# Altium PCB MainBoardPCB_PWR.PcbDoc (part 22 of 29)
Units mm, origin at the board's own origin, x right, y up, seen from the top; angles counter-clockwise.
Board outline 333.63 x 349.38 mm, 16 copper layers (L1, L2 (GND), L3 (Sign), L4 (GND), L5 (Sign), L6 (PWR/GND), L7(PWR/GND), L8 (PWR/GND), L9 (PWR/GND), L10 (PWR/GND), L11 (PWR/GND), L12 (Sign), L13 (GND), L14 (Sign), L15 (GND), L16), stack 2.503 mm thick; 2187 components, 1615 nets, 7987 pads, 1695 vias.
Unrouted connection lines stored in the file: 4757.
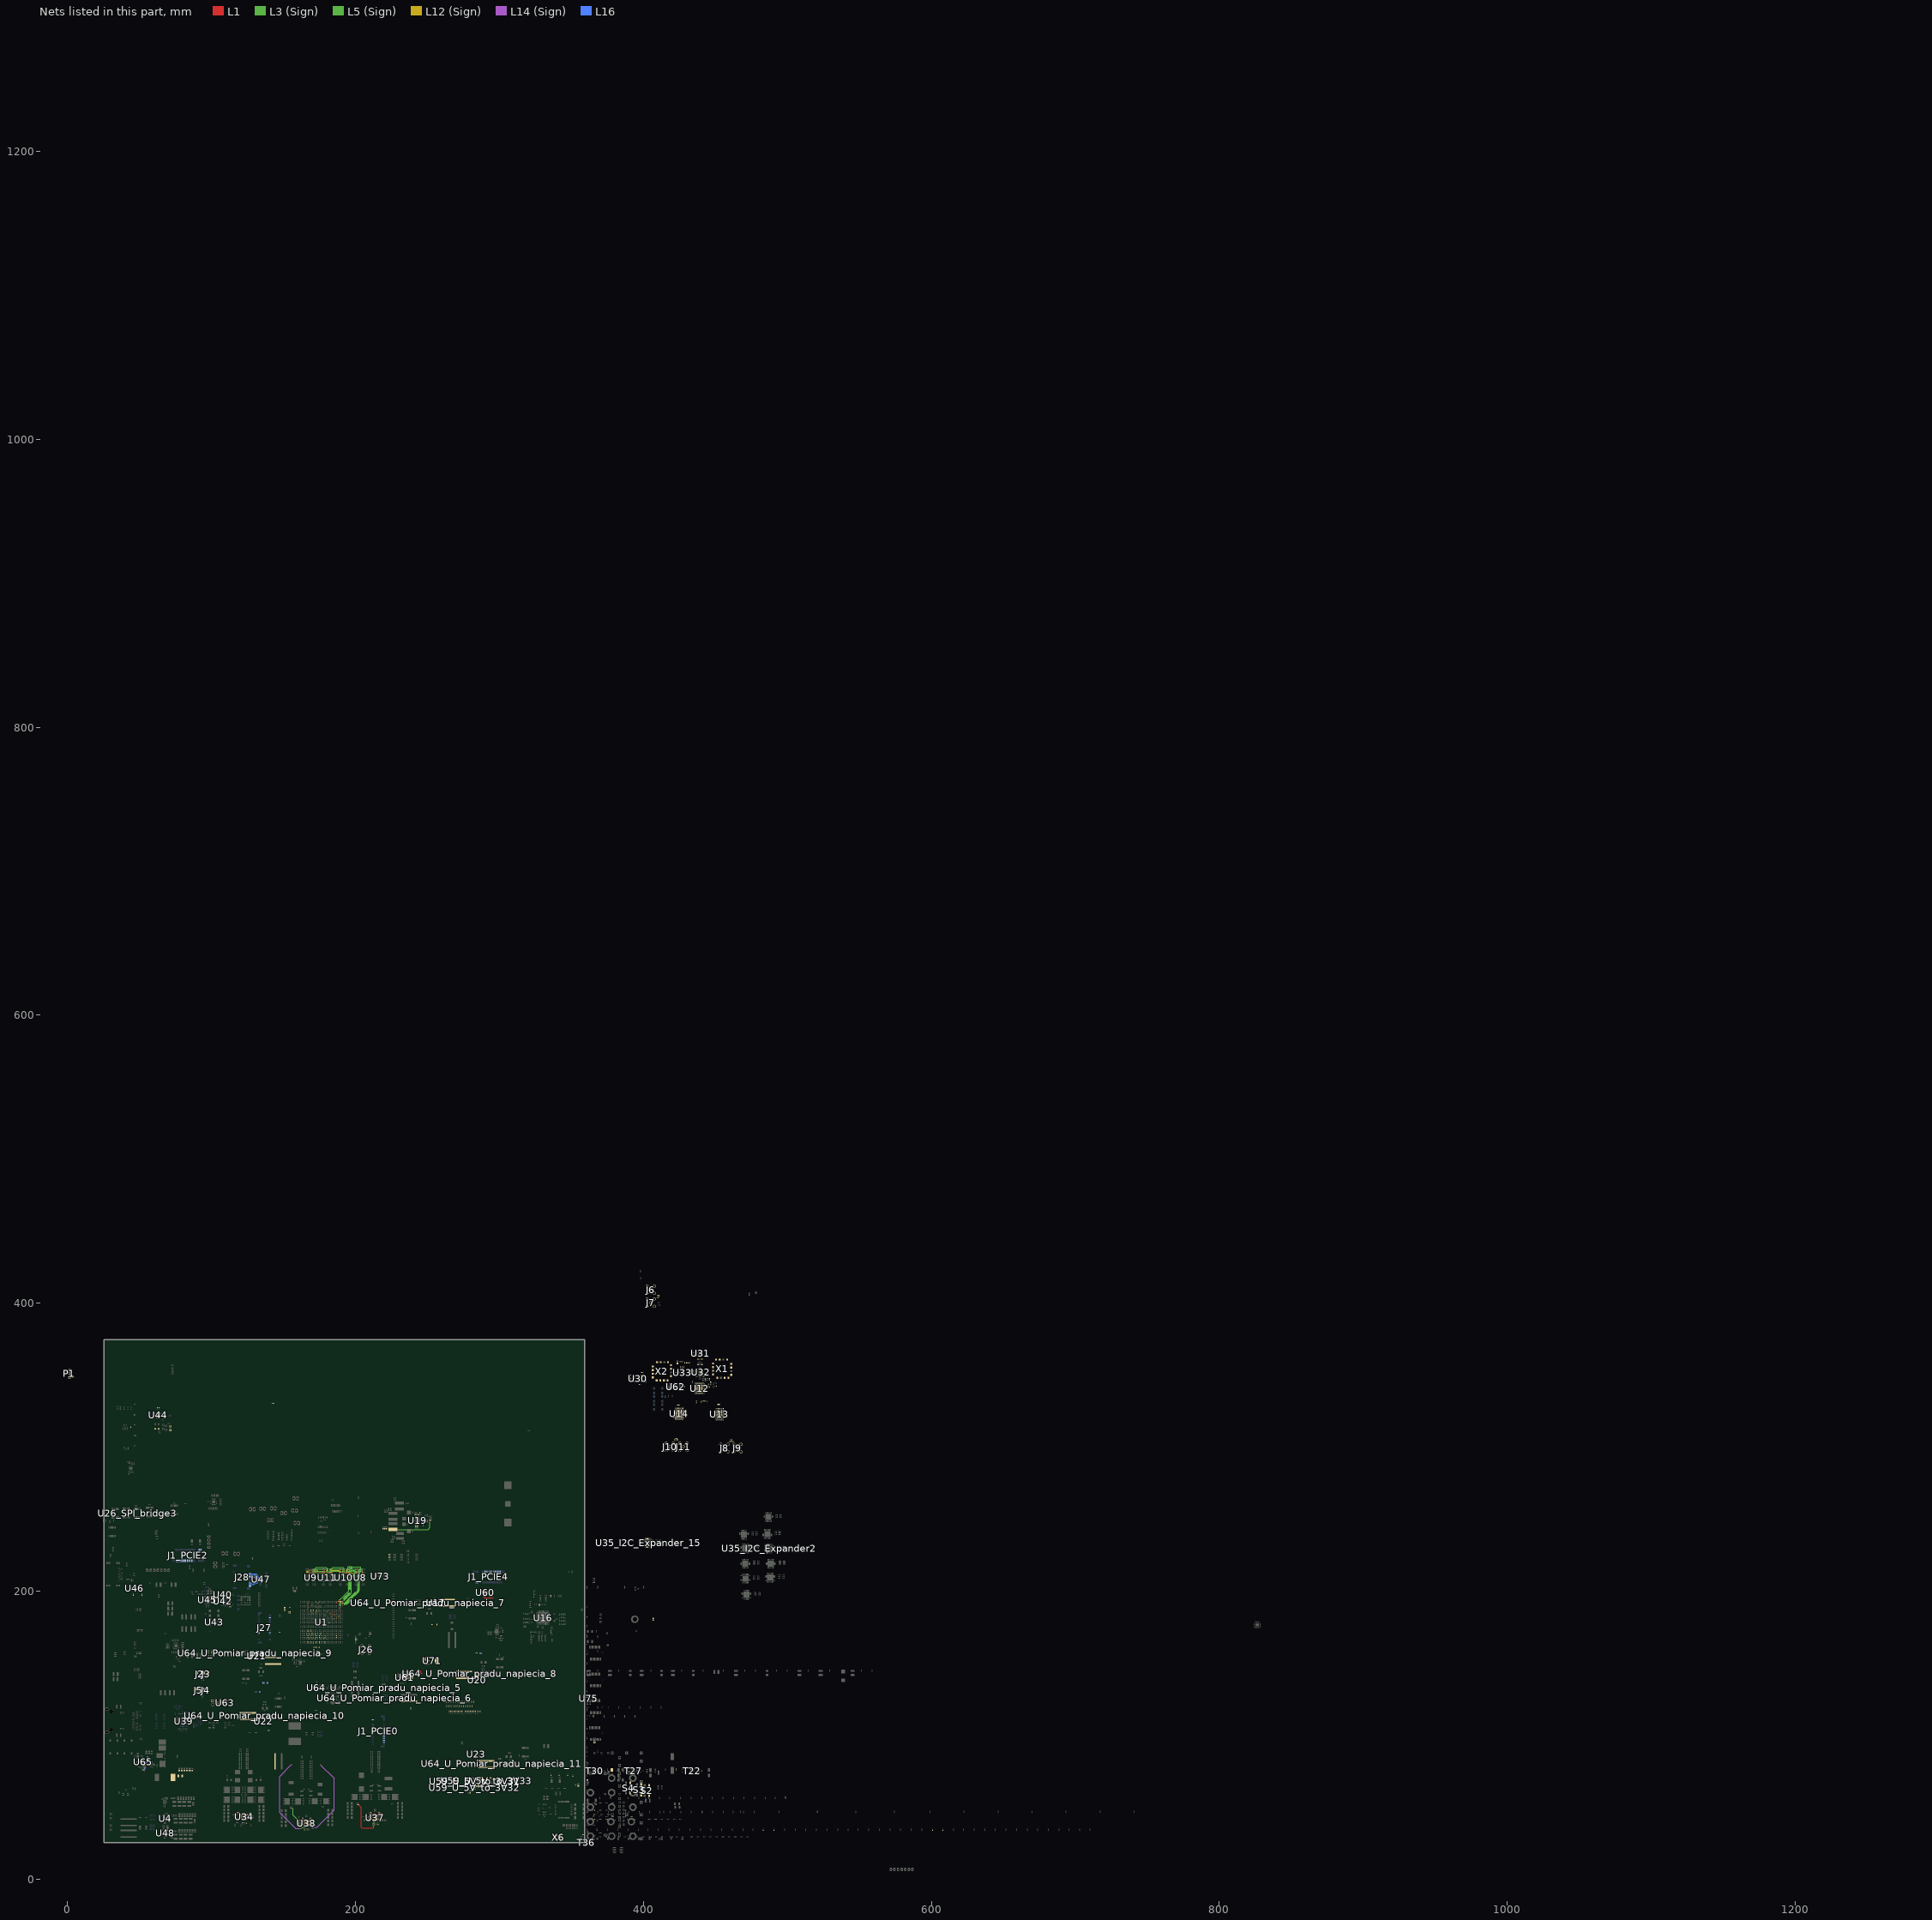
[diagram p17: the nets of this part, all layers, seen from the top]

## Via types
v1: diameter 0.5, hole 0.2, L1 to L16, 786 vias
v2: diameter 0.5/0.35/0.35/0.35/0.35/0.35/0.35/0.35/0.35/0.35/0.35/0.35/0.35/0.35/0.35/0.5 (per signal layer), hole 0.15, L1 to L16, tented both sides, 164 vias
v3: diameter 2.54, hole 1.02, L1 to L16, 152 vias
v4: diameter 0.5/0.35/0.35/0.35/0.35/0.35/0.35/0.35/0.35/0.35/0.35/0.35/0.35/0.35/0.35/0.5 (per signal layer), hole 0.2, L1 to L16, tented both sides, 100 vias
v5: diameter 0.45, hole 0.15, L1 to L16, 79 vias
v6: diameter 0.35/0/0.35 (per signal layer), hole 0.127, L1 to L3 (Sign), tented both sides, 78 vias
v7: diameter 0.45/0.45/0.45/0.45/0.45/0.45/0.45/0.45/0.45/0.45/0.45/0.45/0.45/0.45/0.45/0.45 (per signal layer), hole 0.15, L1 to L16, 65 vias
v8: diameter 0.4, hole 0.15, L1 to L16, 61 vias
v9: diameter 0.2, hole 0.1, L1 to L16, 35 vias
v10: diameter 0.5, hole 0.2, L1 to L16, tented both sides, 32 vias
v11: diameter 0.2/0/0.2 (per signal layer), hole 0.1, L1 to L3 (Sign), 28 vias
v12: diameter 0.4, hole 0.2, L1 to L16, 16 vias
v13: diameter 0.25, hole 0.2, L1 to L16, 16 vias
v14: diameter 0.3, hole 0.2, L1 to L16, 15 vias
v15: diameter 0.5/0.35/0.35/0.35/0.35/0.35/0.35/0.35/0.35/0.35/0.35/0.35/0.35/0.35/0.35/0.45 (per signal layer), hole 0.15, L1 to L16, tented both sides, 10 vias
v16: diameter 5, hole 3, L1 to L16, 9 vias
v17: diameter 0.2/0/0.2 (per signal layer), hole 0.1, L1 to L3 (Sign), tented both sides, 9 vias
v18: diameter 0.35/0/0.35 (per signal layer), hole 0.127, L1 to L3 (Sign), 7 vias
v19: diameter 0.35/0/0.35 (per signal layer), hole 0.127, L14 (Sign) to L16, tented both sides, 5 vias
v20: diameter 1.65, hole 1.65, L1 to L16, 4 vias
v21: diameter 1.15, hole 1.15, L1 to L16, 4 vias
v22: diameter 0.35, hole 0.127, L1 to L2 (GND), 2 vias
v23: diameter 0.4, hole 0.2, L1 to L16, tented both sides, 2 vias
v24: diameter 0.35, hole 0.127, L1 to L2 (GND), tented both sides, 2 vias
v25: diameter 0.508, hole 0.127, L1 to L2 (GND), 2 vias
v26: diameter 0.508, hole 0.127, L2 (GND) to L3 (Sign), 2 vias
v27: diameter 0.35, hole 0.127, L3 (Sign) to L6 (PWR/GND), tented both sides, 2 vias
v28: diameter 0.5, hole 0.2, L3 (Sign) to L6 (PWR/GND), tented both sides, 2 vias
v29: diameter 5.5, hole 3.5, L1 to L16, 1 vias
v30: diameter 0.45/0.45/0.45 (per signal layer), hole 0.15, L1 to L3 (Sign), 1 vias
v31: diameter 0.35/0.35/0.35 (per signal layer), hole 0.127, L1 to L3 (Sign), tented both sides, 1 vias
v32: diameter 0.45/0/0.45 (per signal layer), hole 0.15, L1 to L3 (Sign), tented both sides, 1 vias
v33: diameter 0.45/0/0.45 (per signal layer), hole 0.2, L14 (Sign) to L16, tented both sides, 1 vias
v34: diameter 0.35, hole 0.127, L2 (GND) to L3 (Sign), 1 vias

## Nets (pads, with @x,y where several pads share a name; then routed paths per layer and width w, separated by ;. In a path a pad name is that pad's centre, name@x,y a point inside that pad or via, vN(x,y) a via of type N, cw(c..) or ccw(c..) an arc to the next point about the centre after c; other vN are vias at no path point) (continued)
5V_RAIL: C515.2 C516.2 C563_U_5V_to_3V31.2 C563_U_5V_to_3V32.2 C563_U_5V_to_3V33.2 C564_U_5V_to_3V31.2 C564_U_5V_to_3V32.2 C564_U_5V_to_3V33.2 C574.2 C575.2 C720.2 C728.2 C733.2 D23.2 R315.2 R448_U_Pomiar_pradu_napiecia_6.2 R651.2 R656.2 T22.1 T27.2 T30.2 U40.1 U40.2 U40.3 U42.1 U42.2 U42.3 U45.21 U46.C3 U46.D3 U46.D4 U46.E3 U46.E4 U46.F3 U46.F4 U59_U_5V_to_3V31.1 U59_U_5V_to_3V31.2 U59_U_5V_to_3V32.1 U59_U_5V_to_3V32.2 U59_U_5V_to_3V33.1 U59_U_5V_to_3V33.2 U61.1 U61.2 U61.4 U61.5 U64_U_Pomiar_pradu_napiecia_6.8 U64_U_Pomiar_pradu_napiecia_6.9 U73.1 | length 54.5
  L14 (Sign) w0.254: v8(170.799,36.103) 173.242,36.103 185.2,48.06 ; v9(175.872,79.295) 185.204,69.963 185.204,48.06
12V_HiSpeed: C304.1 C305.1 C306.1 C307.1 C604.2 C714.2 FB34.1 L15.1 R448_U_Pomiar_pradu_napiecia_5.2 R626.2 U17.C3 U17.D3 U17.D4 U17.E3 U17.E4 U17.F3 U17.F4 U19.9 U19.11 U19.26 U19.28 U20.C3 U20.D3 U20.D4 U20.E3 U20.E4 U20.F3 U20.F4 U21.C3 U21.D3 U21.D4 U21.E3 U21.E4 U21.F3 U21.F4 U22.C3 U22.D3 U22.D4 U22.E3 U22.E4 U22.F3 U22.F4 U23.C3 U23.D3 U23.D4 U23.E3 U23.E4 U23.F3 U23.F4 U64_U_Pomiar_pradu_napiecia_5.8 U64_U_Pomiar_pradu_napiecia_5.9 U71.1 | length 58.1
  L1 w0.254: v8(161.537,35.058) R626.2@161.887,35.058 ; 245.476,144.878 245.476,143.28 245.982,142.773 245.982,142.723
  L14 (Sign) w0.254: v9(155.553,79.395) 147.38,71.222 147.38,46.175 158.497,35.058 v8(161.537,35.058)
12V_PCIE0: R448_U_Pomiar_pradu_napiecia_7.1 U17.C2 U17.D1 U17.D2 U17.E1 U17.E2 U17.F1 U17.F2 U64_U_Pomiar_pradu_napiecia_7.10
12V_PCIE0_CM: J1_PCIE0.60 J1_PCIE0.62 J1_PCIE0.64 J1_PCIE0.66 R448_U_Pomiar_pradu_napiecia_7.2 U64_U_Pomiar_pradu_napiecia_7.8 U64_U_Pomiar_pradu_napiecia_7.9
12V_PCIE1: R448_U_Pomiar_pradu_napiecia_8.1 U20.C2 U20.D1 U20.D2 U20.E1 U20.E2 U20.F1 U20.F2 U64_U_Pomiar_pradu_napiecia_8.10
12V_PCIE1_CM: R448_U_Pomiar_pradu_napiecia_8.2 U64_U_Pomiar_pradu_napiecia_8.8 U64_U_Pomiar_pradu_napiecia_8.9
12V_PCIE2: R448_U_Pomiar_pradu_napiecia_9.1 U21.C2 U21.D1 U21.D2 U21.E1 U21.E2 U21.F1 U21.F2 U64_U_Pomiar_pradu_napiecia_9.10
12V_PCIE2_CM: J1_PCIE2.60 J1_PCIE2.62 J1_PCIE2.64 J1_PCIE2.66 R448_U_Pomiar_pradu_napiecia_9.2 U64_U_Pomiar_pradu_napiecia_9.8 U64_U_Pomiar_pradu_napiecia_9.9
12V_PCIE3: R448_U_Pomiar_pradu_napiecia_10.1 U22.C2 U22.D1 U22.D2 U22.E1 U22.E2 U22.F1 U22.F2 U64_U_Pomiar_pradu_napiecia_10.10
12V_PCIE3_CM: R448_U_Pomiar_pradu_napiecia_10.2 U64_U_Pomiar_pradu_napiecia_10.8 U64_U_Pomiar_pradu_napiecia_10.9
12V_PCIE4: R448_U_Pomiar_pradu_napiecia_11.1 U23.C2 U23.D1 U23.D2 U23.E1 U23.E2 U23.F1 U23.F2 U64_U_Pomiar_pradu_napiecia_11.10
12V_PCIE4_CM: J1_PCIE4.60 J1_PCIE4.62 J1_PCIE4.64 J1_PCIE4.66 R448_U_Pomiar_pradu_napiecia_11.2 U64_U_Pomiar_pradu_napiecia_11.8 U64_U_Pomiar_pradu_napiecia_11.9
\I\N\T\: R709.2 U39.44
\M\R\: D11.1 D12.1 P5.1 R371.1 U44.13
ADP1741_3.6V: C308.2 C354.2 C355.2 C570.2 C603.2 L13.2 R113.2 U60.1 U60.2 U60.3 U60.15 U60.16 | length 31.4
  L1 w0.254: L13.2@225.965,242.859 229.313,242.859 229.431,242.741 v18(229.457,242.741) ; R113.2@251.788,249.011 251.788,248.318 251.811,248.295 v18(251.811,248.258)
  L3 (Sign) w0.254: v18(229.457,242.741) 250.449,242.741 251.811,244.104 v18(251.811,248.258)
ADP1741_EN: U35_I2C_Expander2.18 U60.4
ADP1741_PG: U35_I2C_Expander2.2 U60.5 | length 8.3
  L1 w0.254: U60.5@289.065,197.356 289.065,196.001 289.606,195.46 295.801,195.46
ADP_Vin_1: C395.2 R285.2 U37.3 | length 30.2
  L1 w0.254: R285.2@201.912,51.702 201.962,51.702 202.135,51.529 202.135,51.479 203.987,49.627 203.987,36.069 204.459,35.596 212.415,35.596 212.68,35.861 212.68,36.868 C395.2@212.81,36.998 v11(212.92,36.999) ; U37.3@212.795,40.359 212.795,39.955 v11(212.86,39.889)
  L3 (Sign) w0.254: v11(212.86,39.889) 212.92,39.83 v11(212.92,36.999)
ADP_Vin_2: C436.2 R303.2 U38.3 | length 19.4
  L1 w0.254: R303.2@155.628,49.178 v11(156.259,49.178) ; C436.2@160.318,38.813 v11(160.318,38.943) ; v11(165.283,36.265) U38.3@165.283,36.515
  L3 (Sign) w0.254: v11(156.259,49.178) 156.284,49.178 156.684,48.778 156.684,44.502 160.318,40.868 v11(160.318,38.943) 160.8,38.462 160.8,38.044 162.734,36.11 165.129,36.11 v11(165.283,36.265)
AGND: C45.1 C46.1 C55.1 C56.1 C57.1 C58.1 C59.1 C60.1 C61.1 C62.1 C65.1 C66.1 C68.1 C69.1 C71.1 C72.1 C73.1 C74.1 C84.1 C85.1 C86.1 C87.1 C94.1 C95.1 C97.1 C98.1 C111.1 C112.1 C113.1 C114.1 C115.1 C116.1 C117.1 C118.1 C119.1 C120.1 C121.1 C122.1 C123.1 C128.1 C129.1 C130.1 C131.1 C132.1 C133.1 C134.1 C135.1 C136.1 C137.1 C138.1 C139.1 C140.1 C149.1 C150.1 C151.1 C152.1 C153.1 C154.1 C155.1 C156.1 C157.1 C158.1 C159.1 C160.1 C161.1 C166.1 C167.1 C168.1 C169.1 C170.1 C171.1 C172.1 C173.1 C174.1 C175.1 C176.1 C177.1 C178.1 C181.1 C182.1 C183.1 C184.1 C185.1 C186.1 C187.1 C188.1 C189.1 C190.1 C191.1 C192.1 C193.1 C194.1 C195.1 C196.1 C197.1 C198.1 C199.1 C200.1 C201.1 C202.1 C203.1 C204.1 C205.1 C206.1 C322.1 C323.1 C324.1 C326.1 C327.1 C328.1 C329.1 C335.1 C336.1 C337.1 C338.1 C339.1 C340.1 C344.2 C563_U_5V_to_3V31.1 C563_U_5V_to_3V32.1 C563_U_5V_to_3V33.1 C564_U_5V_to_3V31.1 C564_U_5V_to_3V32.1 C564_U_5V_to_3V33.1 C565_U_5V_to_3V31.1 C565_U_5V_to_3V32.1 C565_U_5V_to_3V33.1 C566_U_5V_to_3V31.1 C566_U_5V_to_3V32.1 C566_U_5V_to_3V33.1 C567_U_5V_to_3V31.1 C567_U_5V_to_3V32.1 C567_U_5V_to_3V33.1 C568.1 C569.1 C570.1 C571.2 C580.1 C581.1 C582.1 C583.1 C584.1 C713.1 C714.1 FB35.2 J2.1 J2.3 J3.1 J3.3 J4.1 J4.3 J5.1 J5.3 J6.2 J6.3 J6.4 J6.5 J7.2 J7.3 J7.4 J7.5 J8.2 J8.3 J8.4 J8.5 J9.2 J9.3 J9.4 J9.5 J10.2 J10.3 J10.4 J10.5 J11.2 J11.3 J11.4 J11.5 J26.2 J26.3 J26.4 J26.5 R246.1 R247.1 R248.1 R249.2 R254.1 R255.1 R256.1 R258.2 R261.1 R262.1 R263.1 R264.1 R265.1 R291.2 R301.2 R387.1 R432_U_5V_to_3V31.1 R432_U_5V_to_3V32.1 R432_U_5V_to_3V33.1 R434.1 R444.1 R445.1 R482.2 R483.2 R487.1 R536.2 R537.1 R609.1 T36.2 U12.36 U12.41 U12.53 U13.36 U13.41 U13.53 U14.36 U14.41 U14.53 U31.1 U31.2 U31.17 U32.1 U32.17 U33.5 U33.6 U33.14 U33.17 U59_U_5V_to_3V31.4 U59_U_5V_to_3V31.9 U59_U_5V_to_3V32.4 U59_U_5V_to_3V32.9 U59_U_5V_to_3V33.4 U59_U_5V_to_3V33.9 U60.6 U60.17 U62.5 U62.8 U62.11 U71.2 X1.1 X1.3 X1.4 X1.5 X1.6 X1.7 X1.8 X1.9 X1.11 X1.12 X1.13 X1.15 X1.16 | length 10.2
  L1 w0.116: v4(182.44,184.44) 182.927,184.927 ; v10(183.44,182.44) 183.927,182.927 ; 184.44,180.44 184.927,180.927 ; v4(184.44,186.414) 184.927,185.927 ; v4(185.44,183.44) 185.927,183.927 ; v10(186.44,181.44) 186.927,181.927 ; v4(186.44,192.414) 186.927,191.927 ; v4(188.44,182.44) 188.927,182.927 ; 188.927,187.927 v4(189.414,188.414) ; v10(189.44,180.44) 189.927,180.927 ; 189.927,185.927 v4(190.414,186.414) ; 189.927,190.927 v4(190.414,190.44) ; 190.927,192.927 v4(191.414,193.414)
  L1 w0.254: U60.6@289.715,197.356 289.715,196.668 290.047,196.336 290.047,196.326 C571.2@290.07,196.303
  other v1: 282.254,63.034 283.254,63.034 282.254,64.034 283.254,64.034 282.497,67.484 283.497,67.484 290.431,67.809 291.431,67.809 282.497,68.484 283.497,68.484 290.431,68.809 291.431,68.809 289.49,198.481 290.59,198.481 289.49,199.582 290.59,199.582 450.58,320.088 451.68,320.088 452.78,320.088 453.88,320.088 454.98,320.088 422.513,320.338 423.613,320.338 424.713,320.338 425.813,320.338 426.913,320.338 450.58,321.188 451.68,321.188 452.78,321.188 453.88,321.188 454.98,321.188 422.513,321.438 423.613,321.438 424.713,321.438 425.813,321.438 426.913,321.438 450.58,322.288 451.68,322.288 452.78,322.288 453.88,322.288 454.98,322.288 422.513,322.538 423.613,322.538 424.713,322.538 425.813,322.538 426.913,322.538 450.58,323.388 451.68,323.388 452.78,323.388 453.88,323.388 454.98,323.388 422.513,323.638 423.613,323.638 424.713,323.638 425.813,323.638 426.913,323.638 450.58,324.488 451.68,324.488 452.78,324.488 453.88,324.488 454.98,324.488 422.513,324.738 423.613,324.738 424.713,324.738 425.813,324.738 426.913,324.738 450.58,325.588 451.68,325.588 452.78,325.588 453.88,325.588 454.98,325.588 422.513,325.838 423.613,325.838 424.713,325.838 425.813,325.838 426.913,325.838 436.668,338.092 437.768,338.092 438.868,338.092 439.968,338.092 441.068,338.092 436.668,339.192 437.768,339.192 438.868,339.192 439.968,339.192 441.068,339.192 436.668,340.292 437.768,340.292 438.868,340.292 439.968,340.292 441.068,340.292 421.949,341.08 422.711,341.08 436.668,341.392 437.768,341.392 438.868,341.392 439.968,341.392 441.068,341.392 421.949,341.842 422.711,341.842 436.668,342.492 437.768,342.492 438.868,342.492 439.968,342.492 441.068,342.492 421.949,342.604 422.711,342.604 436.668,343.592 437.768,343.592 438.868,343.592 439.968,343.592 441.068,343.592
  other v4: 168.927,182.927 178.927,182.927 180.927,183.927 167.927,184.927 168.927,184.927 169.927,184.927 170.927,184.927 171.927,184.927 172.927,184.927 177.927,184.927 167.927,185.927 173.927,185.927 179.927,185.927 166.927,186.927 167.927,186.927 169.927,186.927 171.927,186.927 173.927,186.927 176.927,186.927 166.927,187.927 173.927,187.927 166.927,188.927 168.927,188.927 170.927,188.927 172.927,188.927 173.927,188.927 175.927,188.927 166.927,189.927 167.927,189.927 169.927,189.927 173.927,189.927 177.927,189.927 166.927,190.927 167.927,190.927 169.927,190.927 171.927,190.927 173.927,190.927 166.927,191.927 168.927,191.927 170.927,191.927 172.927,191.927 173.927,191.927 176.927,191.927 166.927,192.927 168.927,192.927 170.927,192.927 172.927,192.927 173.927,192.927
  other v12: 426.527,351.311 427.477,351.311 426.527,352.261 427.477,352.261
AGND_1: C389.1 C393.1 C395.1 C398.1 C399.1 C639.1 C640.1 C641.1 C642.1 C643.1 C644.1 R290.1 R294.1 R300.1 U37.6 U37.33
  other v1: 212.945,41.059 214.145,41.059 211.995,42.009 212.945,42.009 214.145,42.009 215.095,42.009 211.995,43.209 212.945,43.209 214.145,43.209 215.095,43.209 212.945,44.159 214.145,44.159
  other v5: 211.905,36.998 215.795,37.716 212.295,38.101 214.259,39.727 207.935,41.139 219.162,41.194 206.788,41.314 209.061,41.359 218.07,41.359 220.17,41.34 208.941,42.36 217.945,42.359 205.776,43.462 208.951,45.299 218.055,45.314
AGND_2: C430.1 C434.1 C436.1 C439.1 C440.1 C548.1 C549.1 C647.1 C648.1 C650.1 C652.1 R312.1 R318.1 R627.1 U38.6 U38.33
  other v1: 165.433,37.215 166.633,37.215 164.483,38.165 165.433,38.165 166.633,38.165 167.583,38.165 164.483,39.365 165.433,39.365 166.633,39.365 167.583,39.365 165.433,40.315 166.633,40.315
  other v5: 167.448,34.037 170.674,35.175 162.014,36.005 171.666,37.79 160.268,37.9 170.624,37.89 161.469,38.015 170.624,38.803 161.453,39.015
Analog_In5: U1.AD14
Analog_In6: U1.AA14
Analog_In7: U1.AB14
ANGD: C345.1 C349.1 C351.1 C356.1 C357.1 C358.2 C634.1 C635.1 R273.1 U34.6 U34.33
  other v1: 124.277,37.96 121.487,38.325 122.127,41.606 123.327,41.606 118.596,41.923 127.919,42.524 121.177,42.556 122.127,42.556 123.327,42.556 124.277,42.556 121.177,43.756 122.127,43.756 123.327,43.756 124.277,43.756 127.934,44.139 117.646,44.404 116.442,44.623 122.127,44.706 123.327,44.706
B223_Rx0_N: J1_PCIE0.47 U1.W3
B223_Rx0_P: J1_PCIE0.49 U1.W4
B223_Rx1_N: J1_PCIE0.35 U1.V5
B223_Rx1_P: J1_PCIE0.37 U1.V6
B223_Rx2_N: U1.T5
B223_Rx2_P: U1.T6
B223_Rx3_N: U1.R3
B223_Rx3_P: U1.R4
B223_Tx0_to_C_N: C268.1 J1_PCIE0.41
B223_Tx0_to_C_P: C267.1 J1_PCIE0.43
B223_Tx0C_to_B_N: C268.2 U1.V1
B223_Tx0C_to_B_P: C267.2 U1.V2
B223_Tx1_to_C_N: C270.1 J1_PCIE0.29
B223_Tx1_to_C_P: C269.1 J1_PCIE0.31
B223_Tx1C_to_B_N: C270.2 U1.U3
B223_Tx1C_to_B_P: C269.2 U1.U4
B223_Tx2_to_C_N: C272.1
B223_Tx2_to_C_P: C271.1
B223_Tx2C_to_B_N: C272.2 U1.T1
B223_Tx2C_to_B_P: C271.2 U1.T2
B223_Tx3_to_C_N: C275.1
B223_Tx3_to_C_P: C274.1
B223_Tx3C_to_B_N: C275.2 U1.P1
B223_Tx3C_to_B_P: C274.2 U1.P2
B224_Rx0_N: J1_PCIE2.47 U1.P5
B224_Rx0_P: J1_PCIE2.49 U1.P6
B224_Rx1_N: J1_PCIE2.35 U1.M5
B224_Rx1_P: J1_PCIE2.37 U1.M6
B224_Rx2_N: U1.L3
B224_Rx2_P: U1.L4
B224_Rx3_N: U1.K5
B224_Rx3_P: U1.K6
B224_Tx0_to_C_N: C280.1 J1_PCIE2.41
B224_Tx0_to_C_P: C279.1 J1_PCIE2.43
B224_Tx0C_to_B_N: C280.2 U1.N3
B224_Tx0C_to_B_P: C279.2 U1.N4
B224_Tx1_to_C_N: C282.1 J1_PCIE2.29
B224_Tx1_to_C_P: C281.1 J1_PCIE2.31
B224_Tx1C_to_B_N: C282.2 U1.M1
B224_Tx1C_to_B_P: C281.2 U1.M2
B224_Tx2_to_C_N: C284.1
B224_Tx2_to_C_P: C283.1
B224_Tx2C_to_B_N: C284.2 U1.K1
B224_Tx2C_to_B_P: C283.2 U1.K2
B224_Tx3_to_C_N: C287.1
B224_Tx3_to_C_P: C286.1
B224_Tx3C_to_B_N: C287.2 U1.J3
B224_Tx3C_to_B_P: C286.2 U1.J4
B225_Rx0_N: J1_PCIE4.47 U1.H5
B225_Rx0_P: J1_PCIE4.49 U1.H6
B225_Rx1_N: J1_PCIE4.35 U1.G7
B225_Rx1_P: J1_PCIE4.37 U1.G8
B225_Rx2_N: J1_PCIE4.23 U1.F5
B225_Rx2_P: J1_PCIE4.25 U1.F6
B225_Rx3_N: J1_PCIE4.11 U1.E7
B225_Rx3_P: J1_PCIE4.13 U1.E8
B225_Tx0_to_C_N: C292.1 J1_PCIE4.41
B225_Tx0_to_C_P: C291.1 J1_PCIE4.43
B225_Tx0C_to_B_N: C292.2 U1.H1
B225_Tx0C_to_B_P: C291.2 U1.H2
B225_Tx1_to_C_N: C294.1 J1_PCIE4.29
B225_Tx1_to_C_P: C293.1 J1_PCIE4.31
B225_Tx1C_to_B_N: C294.2 U1.G3
B225_Tx1C_to_B_P: C293.2 U1.G4
B225_Tx2_to_C_N: C296.1 J1_PCIE4.19
B225_Tx2_to_C_P: C295.1 J1_PCIE4.17
B225_Tx2C_to_B_N: C296.2 U1.F1
B225_Tx2C_to_B_P: C295.2 U1.F2
B225_Tx3_to_C_N: C299.1 J1_PCIE4.7
B225_Tx3_to_C_P: C298.1 J1_PCIE4.5
B225_Tx3C_to_B_N: C299.2 U1.E3
B225_Tx3C_to_B_P: C298.2 U1.E4
B503_Ground: C531.2 C532.2 C533.2 C534.2 C535.1 C536.1 P5.2 R358.2 R359.2 R360.2 R361.2 R373.1 R720.2 S2.3 S2.4 S3.3 S3.4 S4.3 S4.4 U43.9 U43.10 U44.4 U44.5 U44.17 X6.2 | length 0.9
  L1 w0.2: C535.1@157.404,200.432 C536.1@158.344,200.432
  other v1: 62.4,321.691 63.5,321.691 62.4,322.791 63.5,322.791
  other v22: 157.874,200.432
  other v34: 157.874,200.432
Bank223_MGTREF0_C_N: C276.1 U1.R7
Bank223_MGTREF0_C_P: C273.1 U1.R8
Bank223_MGTREF1_C_N: C278.1 U1.N7
Bank223_MGTREF1_C_P: C277.1 U1.N8
Bank224_MGTREF0_C_N: C288.1 U1.L7
Bank224_MGTREF0_C_P: C285.1 U1.L8
Bank224_MGTREF1_C_N: C290.1 U1.J7
Bank224_MGTREF1_C_P: C289.1 U1.J8
Bank225_MGTREF0_C_N: C300.1 U1.H9
Bank225_MGTREF0_C_P: C297.1 U1.H10
Bank225_MGTREF1_C_N: C302.1 U1.F9
Bank225_MGTREF1_C_P: C301.1 U1.F10
Bank505_MGTRREF0_C_N: C526.2 R69.2 U1.M24
Bank505_MGTRREF0_C_P: C525.2 R69.1 U1.M23
Bank505_MGTRREF2_C_N: C528.2 R126.2 U1.K24
Bank505_MGTRREF2_C_P: C527.2 R126.1 U1.K23
Bank505_MGTRREF3_C_N: C530.2 R70.2 U1.H24
Bank505_MGTRREF3_C_P: C529.2 R70.1 U1.H23
Battery_PWR: P11.1 R679.2 R680.2 U48.2
  other v12: 68.417,32.112
BST1: C346.1 U34.25 | length 2.7
  L1 w0.254: C346.1@118.426,46.421 118.963,46.421 120.404,44.979 120.404,44.908 120.406,44.906 U34.25@120.477,44.906
BST1_1: C390.1 U37.25 | length 2.2
  L1 w0.254: C390.1@210.696,46.316 210.701,46.316 211.295,45.723 U37.25@211.295,44.359
BST1_2: C431.1 U38.25 | length 1.7
  L1 w0.254: C431.1@163.383,42.063 163.383,42.058 163.783,41.658 U38.25@163.783,40.515
BST2: C350.1 U34.16 | length 2.6
  L1 w0.254: U34.16@124.977,44.906 125.561,44.906 126.668,46.013 126.871,46.013 C350.1@127.014,46.156
BST2_1: C394.1 U37.16 | length 2.2
  L1 w0.254: U37.16@215.795,44.359 215.866,44.359 216.265,44.758 C394.1@216.265,46.316
BST2_2: C435.1 U38.16 | length 1.7
  L1 w0.254: U38.16@168.283,40.515 168.283,41.723 168.633,42.073 C435.1@168.633,42.078
CAN1_RxD: R798.1 U63.1
CAN1_TxD: R799.1 U63.4
CAN_H: P6.2 R446.2 R447.2 U63.7 U75.2
CAN_L: P6.1 R446.1 R447.1 U63.6 U75.1
CD_H: J28.9 R381.1 R782.1 U47.D3
Charge_CAP_KEY: R658.2
CLK_Fanout_In_N: U1.AF5
CLK_Fanout_In_P: U1.AF6
CLK_GTR_T1_N: C528.1
CLK_GTR_T1_P: C527.1
CLK_GTR_T2_N: C526.1
CLK_GTR_T2_P: C525.1
CLK_GTR_T3_N: C530.1
CLK_GTR_T3_P: C529.1
CLK_Hi_Rail1_N: R270.1 U12.33 U13.38
CLK_Hi_Rail1_P: R270.2 U12.34 U13.37
CLK_Hi_Rail1_SysRef_N: R534.1 U12.30 U13.48
CLK_Hi_Rail1_SysRef_P: R534.2 U12.31 U13.47
CLK_Hi_Rail2_N: R539.1 U12.6 U14.38
CLK_Hi_Rail2_P: R539.2 U12.7 U14.37
CLK_Hi_Rail2_SysRef_N: R535.1 U12.3 U14.48
CLK_Hi_Rail2_SysRef_P: R535.2 U12.4 U14.47
CLK_M_OSC_In: C333.1 R257.2 U33.2 | length 2.7
  L1 w0.116: C333.1@422.947,351.917 422.993,351.917 R257.2@423.951,351.917 424.963,351.917 425.082,352.036 U33.2@425.602,352.036
CLK_NVME_Conn_N: J27.53 U14.13
CLK_NVME_Conn_P: J27.55 U14.12
CLK_Q223_T1_N: C276.2
CLK_Q223_T1_P: C273.2
CLK_Q224_T1_N: C288.2
CLK_Q224_T1_P: C285.2
CLK_Q225_T1_N: C300.2
CLK_Q225_T1_P: C297.2
CLK_Q226_T1_N: U1.B9
CLK_Q226_T1_P: U1.B10
CLK_SMA0_C_N: C48.2 J6.1
CLK_SMA0_C_P: C47.2 J7.1
CLK_SMA0_N: C48.1 R78.1 U12.9
CLK_SMA0_P: C47.1 R78.2 U12.10
CLK_SMA1_C_N: C50.2 J8.1
CLK_SMA1_C_P: C49.2 J9.1
CLK_SMA1_N: C50.1 R79.1 U13.3
CLK_SMA1_P: C49.1 R79.2 U13.4
CLK_SMA2_C_N: C52.2 J10.1
CLK_SMA2_C_P: C51.2 J11.1
CLK_SMA2_N: C52.1 R80.1 U14.34
CLK_SMA2_P: C51.1 R80.2 U14.33
CLKREF_R: R375.1 X6.3
CLKREQ: J27.52
CMD_SD: J28.3 U47.D4 | length 8
  L14 (Sign) w0.098: v33(129.438,209.982) 130.867,208.553 132.556,208.553 132.956,208.153 133.441,208.153 v19(133.841,207.753)
  L16 w0.098: J28.3@126.749,209.981 v33(129.438,209.982)
COMP1_1: C642.2 R624.2 U37.30 | length 2.7
  L1 w0.254: R624.2@209.801,40.359 209.821,40.379 209.821,41.339 C642.2@209.841,41.359 209.846,41.359 210.346,41.859 U37.30@211.295,41.859
COMP1_2: C548.2 R687.2 U38.30 | length 2.5
  L1 w0.254: R687.2@162.228,37.015 162.238,37.025 162.238,38.005 C548.2@162.249,38.015 U38.30@163.783,38.015
COMP2_1: C641.2 R623.2 U37.11 | length 2.6
  L1 w0.254: U37.11@215.795,41.859 216.66,41.859 217.16,41.359 C641.2@217.165,41.359 217.185,41.339 217.185,40.324 R623.2@217.205,40.305
COMP2_2: C650.2 R631.2 U38.11 | length 2.4
  L1 w0.254: U38.11@168.283,38.015 168.933,38.015 169.058,37.89 C650.2@169.734,37.89 169.754,37.87 169.754,37.02 R631.2@169.774,37
CSN: C694.2 C695.2 C696.2 C697.2 C698.2 C699.2 C700.2 R17.2 R140.2 R150.2 R666.2 U4.2 U65.10 | length 12.3
  L1 w0.254: R150.2@52.782,75.895 53.425,75.895 54.172,76.642 v9(54.172,78.202) 53.355,79.019 53.332,79.042 U65.10@53.332,79.367 ; R17.2@69.643,44.693 69.686,44.65 v5(70.536,44.65)
  L16 w0.254: v9(54.172,78.202) 54.172,80.097 56.068,81.993 v9@56.068,84.026
  other v9: 56.025,84.026
  other v12: 68.21,42.35
CSP: L22.2 R666.1 U65.9 | length 4.5
  L1 w0.254: U65.9@52.832,79.367 52.832,78.847 v9(53.572,78.107)
  L16 w0.254: v9(53.572,75.202) v9(53.572,78.107)
CSU: P1.2 R783.1
CSU_Neg: P1.3 R109.2
CSU_Pos: P1.1 R106.2
D_05028_G0: R540.2 U1.AA15 U16.45
D_05028_G0_1: R540.1 U35_I2C_Expander_15.2
D_05028_G3: U16.40 U35_I2C_Expander_15.18
D_05028_G4: U16.41 U35_I2C_Expander_15.3
D_05028_G5: U16.12 U35_I2C_Expander_15.22
D_05028_G6: U16.13 U35_I2C_Expander_15.19
D_05028_S0: U16.55 U35_I2C_Expander_15.21
D_05028_S1: U16.56 U35_I2C_Expander_15.20
DAC1220_Vref: C320.2 R608.1 R609.2 U30.12
DAC_AGND: U30.4 U30.13 X2.1 X2.3 X2.4 X2.5 X2.6 X2.7 X2.8 X2.9 X2.11 X2.12 X2.13 X2.15 X2.16
DAC_OUT: C321.2 U30.11 X2.2
DAC_SPI_CLK: U26_SPI_bridge3.14 U30.16
DAC_SPI_MOSI: R481.1 U26_SPI_bridge3.12 U30.15
DAS/DSS#: J27.10
DATA0_SD: J28.7 U47.D5 | length 8
  L16 w0.098: J28.7@126.749,205.581 126.98,205.812 131.593,205.812 131.978,206.197 131.978,206.896 132.836,207.753 U47.D5@133.439,207.753
DATA1_SD: J28.8 U47.E5 | length 8.3
  L16 w0.098: J28.8@126.749,204.481 129.361,204.481 130.48,205.6 131.762,205.6 132.309,206.146 132.309,206.794 132.868,207.353 U47.E5@133.439,207.353
DATA2_SD: J28.1 U47.A5 | length 8.6
  L16 w0.098: J28.1@126.749,212.181 131.141,212.181 131.886,211.436 131.886,210.506 U47.A5@133.439,208.953
DATA3_SD: J28.2 R383.1 U47.B5 | length 8
  L16 w0.098: J28.2@126.749,211.081 126.756,211.074 R383.1@130.487,211.074 130.487,210.546 131.356,209.677 132.067,209.677 133.191,208.553 U47.B5@133.439,208.553
Data_2_RX_PCIE0_N: J1_PCIE0.23
Data_2_RX_PCIE0_P: J1_PCIE0.25
Data_2_RX_PCIE1_N: 
Data_2_RX_PCIE1_P: 
Data_2_RX_PCIE2_N: J1_PCIE2.23
Data_2_RX_PCIE2_P: J1_PCIE2.25
Data_2_RX_PCIE3_N: 
Data_2_RX_PCIE3_P: 
Data_2_TX_PCIE0_N: J1_PCIE0.19
Data_2_TX_PCIE0_P: J1_PCIE0.17
Data_2_TX_PCIE1_N: 
Data_2_TX_PCIE1_P: 
Data_2_TX_PCIE2_N: J1_PCIE2.19
Data_2_TX_PCIE2_P: J1_PCIE2.17
Data_2_TX_PCIE3_N: 
Data_2_TX_PCIE3_P: 
Data_3_RX_PCIE0_N: J1_PCIE0.11
Data_3_RX_PCIE0_P: J1_PCIE0.13
Data_3_RX_PCIE1_N: 
Data_3_RX_PCIE1_P: 
Data_3_RX_PCIE2_N: J1_PCIE2.11
Data_3_RX_PCIE2_P: J1_PCIE2.13
Data_3_RX_PCIE3_N: 
Data_3_RX_PCIE3_P: 
Data_3_TX_PCIE0_N: J1_PCIE0.7
Data_3_TX_PCIE0_P: J1_PCIE0.5
Data_3_TX_PCIE1_N: 
Data_3_TX_PCIE1_P: 
Data_3_TX_PCIE2_N: J1_PCIE2.7
Data_3_TX_PCIE2_P: J1_PCIE2.5
Data_3_TX_PCIE3_N: 
Data_3_TX_PCIE3_P: 
DDR4_A0: R31.1 U1.AH30 U8.P3 U9.P3 U10.P3 U11.P3 | length 91.4
  L1 w0.116: v2(170.002,214.252) U9.P3@170.406,213.848 ; v2(181.463,214.252) U11.P3@181.866,213.848 ; U1.AH30@188.927,192.927 v6(189.414,193.414) ; v1(192.923,214.252) U10.P3@193.327,213.848 ; v15(204.356,214.248) 204.388,214.248 U8.P3@204.787,213.848
  L5 (Sign) w0.092: v2(170.002,214.252) 170.533,214.252 170.95,214.668 171.801,214.668 172.524,215.392 179.954,215.392 181.095,214.252 v2(181.463,214.252) 182.058,214.252 182.475,214.668 183.261,214.668 183.985,215.392 191.415,215.392 192.555,214.252 v1(192.923,214.252) 193.454,214.252 193.871,214.668 194.721,214.668 195.445,215.392 195.58,215.392 ccw(c195.58,215.482) 195.669,215.482 195.669,215.832 cw(c195.759,215.832) 195.759,215.921 196.027,215.921 cw(c196.027,215.832) 196.117,215.832 196.117,215.392 196.117,215.287 ccw(c196.207,215.287) 196.207,215.198 196.475,215.198 ccw(c196.475,215.287) 196.565,215.287 196.565,215.392 196.565,215.832 cw(c196.654,215.832) 196.654,215.921 196.923,215.921 cw(c196.923,215.832) 197.013,215.832 197.013,215.392 197.013,215.287 ccw(c197.102,215.287) 197.102,215.198 197.371,215.198 ccw(c197.371,215.287) 197.46,215.287 197.46,215.392 197.46,215.832 cw(c197.55,215.832) 197.55,215.921 197.819,215.921 cw(c197.819,215.832) 197.908,215.832 197.908,215.392 197.908,215.287 ccw(c197.998,215.287) 197.998,215.198 198.266,215.198 ccw(c198.266,215.287) 198.356,215.287 198.356,215.302 cw(c198.446,215.302) 198.446,215.392 202.875,215.392 202.97,215.297 ccw(c203.034,215.36) 203.097,215.297 203.098,215.298 cw(c203.161,215.235) 203.225,215.298 203.415,215.108 cw(c203.351,215.045) 203.415,214.982 203.35,214.917 203.286,214.852 ccw(c203.349,214.789) 203.286,214.726 203.476,214.536 ccw(c203.539,214.599) 203.602,214.536 203.604,214.537 cw(c203.667,214.474) 203.73,214.537 203.946,214.322 204.02,214.248 v15(204.356,214.248) v15@204.392,214.248
  L3 (Sign) w0.092: v6(189.414,193.414) 189.575,193.575 189.949,193.575 190.04,193.484 190.04,193.233 190.309,192.965 190.309,192.823 190.037,192.552 189.76,192.552 189.564,192.748 189.294,192.748 189.093,192.547 189.093,192.269 189.347,192.015 189.347,191.998 189.57,191.775 189.57,191.481 189.27,191.181 189.27,190.998 189.268,190.997 189.268,190.92 189.267,190.918 189.267,190.721 189.093,190.547 189.093,190.281 189.281,190.093 189.618,190.093 189.821,190.297 189.821,190.534 190.169,190.881 190.729,190.881 191.365,191.517 193.257,191.517 202.603,200.863 202.603,200.962 ccw(c202.504,200.962) 202.504,201.062 201.92,201.062 cw(c201.92,201.161) 201.82,201.161 201.82,201.359 cw(c201.92,201.359) 201.92,201.459 202.603,201.459 202.657,201.459 ccw(c202.657,201.558) 202.756,201.558 202.756,201.756 ccw(c202.657,201.756) 202.657,201.856 202.603,201.856 201.92,201.856 cw(c201.92,201.955) 201.82,201.955 201.82,202.153 cw(c201.92,202.153) 201.92,202.253 202.603,202.253 202.657,202.253 ccw(c202.657,202.352) 202.756,202.352 202.756,202.55 ccw(c202.657,202.55) 202.657,202.65 202.603,202.65 202.467,202.65 cw(c202.467,202.749) 202.367,202.749 202.367,202.947 cw(c202.467,202.947) 202.467,203.047 202.603,203.047 202.657,203.047 ccw(c202.657,203.146) 202.756,203.146 202.756,203.344 ccw(c202.657,203.344) 202.657,203.444 202.603,203.444 202.465,203.444 cw(c202.465,203.543) 202.366,203.543 202.366,203.741 cw(c202.465,203.741) 202.465,203.841 202.603,203.841 202.657,203.841 ccw(c202.657,203.94) 202.756,203.94 202.756,204.138 ccw(c202.657,204.138) 202.657,204.238 202.603,204.238 201.92,204.238 cw(c201.92,204.337) 201.82,204.337 201.82,204.535 cw(c201.92,204.535) 201.92,204.635 202.603,204.635 202.657,204.635 ccw(c202.657,204.734) 202.756,204.734 202.756,204.932 ccw(c202.657,204.932) 202.657,205.032 202.603,205.032 202.461,205.032 cw(c202.461,205.131) 202.361,205.131 202.361,205.329 cw(c202.461,205.329) 202.461,205.429 202.603,205.429 202.657,205.429 ccw(c202.657,205.528) 202.756,205.528 202.756,205.726 ccw(c202.657,205.726) 202.657,205.826 202.673,205.826 cw(c202.673,205.895) 202.603,205.895 202.603,207.01 202.603,211.273 202.971,211.642 202.971,214.678 203.421,215.128 203.926,215.128 204.063,214.992 204.063,214.918 204.064,214.916 204.064,214.82 204.391,214.493 v15@204.391,214.252
DDR4_A1: R33.1 U1.AG30 U8.P4 U9.P4 U10.P4 U11.P4 | length 91.1
  L1 w0.116: U9.P4@167.206,213.848 167.602,214.245 v2(167.605,214.245) ; U11.P4@178.666,213.848 179.063,214.245 v2(179.065,214.245) ; U1.AG30@187.927,192.927 v6(188.414,193.414) ; U10.P4@190.127,213.848 190.523,214.245 v2(190.526,214.245) v2@190.484,214.203 ; v15(201.176,214.244) U8.P4@201.58,213.841
  L12 (Sign) w0.092: 165.856,214.245 166.253,213.848 166.886,213.848 167.241,214.203 167.563,214.203 v2(167.605,214.245) v2@167.841,214.245 ; v2@167.602,214.245 v2@167.841,214.245 ; v2@179.063,214.245 180.018,214.245 ; v15(201.176,214.244) 200.909,214.244 200.589,213.924 200,213.924 199.457,213.924 cw(c199.403,213.924) 199.403,213.869 199.063,213.869 cw(c199.063,213.924) 199.009,213.924 199.009,214.488 ccw(c198.919,214.488) 198.919,214.578 198.651,214.578 ccw(c198.651,214.488) 198.561,214.488 198.561,213.924 cw(c198.507,213.924) 198.507,213.869 198.167,213.869 cw(c198.167,213.924) 198.113,213.924 198.113,214.488 ccw(c198.024,214.488) 198.024,214.578 197.755,214.578 ccw(c197.755,214.488) 197.665,214.488 197.665,214.013 cw(c197.576,214.013) 197.576,213.924 197.442,213.924 196.362,213.924 195.638,214.648 194.551,214.648 194.417,214.648 ccw(c194.417,214.558) 194.327,214.558 194.327,214.529 cw(c194.238,214.529) 194.238,214.44 193.969,214.44 cw(c193.969,214.529) 193.88,214.529 193.88,214.558 ccw(c193.79,214.558) 193.79,214.648 193.332,214.648 191.166,214.648 190.762,214.245 v2(190.526,214.245) 190.484,214.203 190.162,214.203 189.865,213.906 189.116,213.906 188.468,214.554 183.334,214.554 183.245,214.643 180.416,214.643 180.018,214.245 ; v2@167.841,214.245 168.245,214.648 173.172,214.648 173.896,213.924 178.744,213.924 v2(179.065,214.245) 180.018,214.245
  L3 (Sign) w0.092: v6(188.414,193.414) 189.081,194.081 189.498,194.081 195.498,200.082 195.498,200.52 195.498,200.773 ccw(c195.399,200.773) 195.399,200.873 195.067,200.873 cw(c195.067,200.972) 194.968,200.972 194.968,201.17 cw(c195.067,201.17) 195.067,201.27 195.498,201.27 196.385,201.27 ccw(c196.385,201.369) 196.484,201.369 196.484,201.567 ccw(c196.385,201.567) 196.385,201.667 195.498,201.667 195.067,201.667 cw(c195.067,201.766) 194.968,201.766 194.968,201.964 cw(c195.067,201.964) 195.067,202.064 195.498,202.064 196.385,202.064 ccw(c196.385,202.163) 196.484,202.163 196.484,202.361 ccw(c196.385,202.361) 196.385,202.461 195.498,202.461 195.067,202.461 cw(c195.067,202.56) 194.968,202.56 194.968,202.758 cw(c195.067,202.758) 195.067,202.858 195.498,202.858 196.385,202.858 ccw(c196.385,202.957) 196.484,202.957 196.484,203.155 ccw(c196.385,203.155) 196.385,203.255 195.498,203.255 195.067,203.255 cw(c195.067,203.354) 194.968,203.354 194.968,203.552 cw(c195.067,203.552) 195.067,203.652 195.498,203.652 196.385,203.652 ccw(c196.385,203.751) 196.484,203.751 196.484,203.949 ccw(c196.385,203.949) 196.385,204.049 195.498,204.049 195.067,204.049 cw(c195.067,204.148) 194.968,204.148 194.968,204.346 cw(c195.067,204.346) 195.067,204.446 195.498,204.446 196.385,204.446 ccw(c196.385,204.545) 196.484,204.545 196.484,204.743 ccw(c196.385,204.743) 196.385,204.843 195.498,204.843 195.067,204.843 cw(c195.067,204.942) 194.968,204.942 194.968,205.14 cw(c195.067,205.14) 195.067,205.24 195.498,205.24 196.385,205.24 ccw(c196.385,205.339) 196.484,205.339 196.484,205.537 ccw(c196.385,205.537) 196.385,205.637 195.498,205.637 195.087,205.637 cw(c195.087,205.736) 194.988,205.736 194.988,205.934 cw(c195.087,205.934) 195.087,206.034 195.498,206.034 196.385,206.034 ccw(c196.385,206.133) 196.484,206.133 196.484,206.331 ccw(c196.385,206.331) 196.385,206.431 195.598,206.431 cw(c195.598,206.53) 195.498,206.53 195.498,206.629 195.498,206.868 196.136,207.505 196.136,209.821 200.132,213.817 200.477,213.817 200.619,213.958 200.623,213.958 200.909,214.244 v15(201.176,214.244)
DDR4_A2: R35.1 U1.AK29 U8.R3 U9.R3 U10.R3 U11.R3 | length 91.2
  L1 w0.116: v2(170.002,215.052) U9.R3@170.406,214.648 ; v2(181.463,215.052) U11.R3@181.866,214.648 ; v6(190.44,191.44) U1.AK29@190.927,191.927 ; v2(192.923,215.052) U10.R3@193.327,214.648 ; v15(204.384,215.052) U8.R3@204.787,214.648
  L5 (Sign) w0.092: v2(170.002,215.052) 170.431,215.052 170.835,215.456 171.742,215.456 172.793,216.507 179.627,216.507 181.082,215.052 v2(181.463,215.052) 181.963,215.052 182.367,215.456 183.202,215.456 184.253,216.507 191.087,216.507 192.542,215.052 v2(192.923,215.052) 193.352,215.052 193.756,215.456 194.663,215.456 194.907,215.7 194.907,216.865 194.983,216.941 195.021,216.941 195.156,216.941 ccw(c195.156,217.031) 195.245,217.031 195.245,217.132 cw(c195.335,217.132) 195.335,217.221 195.603,217.221 cw(c195.603,217.132) 195.693,217.132 195.693,216.941 195.693,216.908 ccw(c195.782,216.908) 195.782,216.818 196.051,216.818 ccw(c196.051,216.908) 196.141,216.908 196.141,216.941 196.141,217.132 cw(c196.23,217.132) 196.23,217.221 196.499,217.221 cw(c196.499,217.132) 196.588,217.132 196.588,216.941 196.588,216.751 ccw(c196.678,216.751) 196.678,216.662 196.947,216.662 ccw(c196.947,216.751) 197.036,216.751 197.036,216.941 197.036,217.132 cw(c197.126,217.132) 197.126,217.221 197.395,217.221 cw(c197.395,217.132) 197.484,217.132 197.484,216.941 197.484,216.751 ccw(c197.574,216.751) 197.574,216.662 197.842,216.662 ccw(c197.842,216.751) 197.932,216.751 197.932,216.852 cw(c198.021,216.852) 198.021,216.941 198.133,216.941 203.657,216.941 203.76,216.838 203.76,215.677 204.384,215.053 v15(204.384,215.052)
  L3 (Sign) w0.092: v6(190.44,191.44) 190.709,191.709 192.993,191.709 193.063,191.78 ccw(c192.993,191.85) 193.063,191.92 192.844,192.139 cw(c192.914,192.209) 192.844,192.279 192.984,192.42 cw(c193.054,192.35) 193.124,192.42 193.414,192.13 193.429,192.115 ccw(c193.499,192.186) 193.569,192.115 193.709,192.256 ccw(c193.639,192.326) 193.709,192.396 193.694,192.411 193.406,192.7 cw(c193.476,192.77) 193.406,192.84 193.546,192.981 cw(c193.616,192.91) 193.686,192.981 193.975,192.692 193.99,192.677 ccw(c194.06,192.747) 194.131,192.677 194.271,192.817 ccw(c194.201,192.887) 194.271,192.958 194.256,192.973 193.968,193.261 cw(c194.038,193.331) 193.968,193.401 194.108,193.541 cw(c194.178,193.471) 194.248,193.541 194.537,193.253 194.552,193.238 ccw(c194.622,193.308) 194.692,193.238 194.832,193.379 ccw(c194.762,193.449) 194.832,193.519 194.817,193.534 194.53,193.822 cw(c194.6,193.892) 194.53,193.962 194.67,194.102 cw(c194.74,194.032) 194.81,194.102 195.098,193.815 195.113,193.8 ccw(c195.183,193.87) 195.253,193.8 195.394,193.94 ccw(c195.324,194.01) 195.394,194.08 195.379,194.096 195.092,194.383 cw(c195.162,194.453) 195.092,194.523 195.232,194.663 cw(c195.302,194.593) 195.372,194.663 195.659,194.376 195.675,194.361 ccw(c195.745,194.431) 195.815,194.361 195.955,194.502 ccw(c195.885,194.572) 195.955,194.642 195.94,194.657 195.654,194.943 cw(c195.724,195.014) 195.654,195.084 195.794,195.224 cw(c195.864,195.154) 195.934,195.224 196.221,194.938 196.236,194.923 ccw(c196.306,194.993) 196.376,194.923 196.517,195.063 ccw(c196.446,195.133) 196.517,195.203 196.502,195.218 196.216,195.504 cw(c196.286,195.574) 196.216,195.645 196.356,195.785 cw(c196.426,195.715) 196.496,195.785 196.782,195.499 196.797,195.484 ccw(c196.868,195.554) 196.938,195.484 197.078,195.624 ccw(c197.008,195.695) 197.078,195.765 197.063,195.78 196.778,196.065 cw(c196.848,196.135) 196.778,196.206 196.918,196.346 cw(c196.988,196.276) 197.058,196.346 197.344,196.061 197.359,196.045 ccw(c197.429,196.116) 197.499,196.045 197.64,196.186 ccw(c197.569,196.256) 197.64,196.326 197.624,196.341 197.34,196.626 cw(c197.41,196.696) 197.34,196.766 197.48,196.907 cw(c197.55,196.837) 197.62,196.907 197.905,196.622 197.92,196.607 ccw(c197.99,196.677) 198.061,196.607 198.201,196.747 ccw(c198.131,196.817) 198.201,196.888 198.186,196.903 197.902,197.187 cw(c197.972,197.257) 197.902,197.327 198.042,197.468 cw(c198.112,197.397) 198.182,197.468 198.467,197.183 198.482,197.168 ccw(c198.552,197.239) 198.622,197.168 198.762,197.309 ccw(c198.692,197.379) 198.762,197.449 198.747,197.464 198.464,197.748 cw(c198.534,197.818) 198.464,197.888 198.604,198.029 cw(c198.674,197.958) 198.744,198.029 199.028,197.745 199.043,197.73 ccw(c199.113,197.8) 199.184,197.73 199.324,197.87 ccw(c199.254,197.94) 199.324,198.011 199.309,198.026 199.026,198.309 cw(c199.096,198.379) 199.026,198.449 199.166,198.589 cw(c199.236,198.519) 199.306,198.589 199.589,198.306 199.605,198.291 ccw(c199.675,198.361) 199.745,198.291 199.885,198.432 ccw(c199.815,198.502) 199.885,198.572 199.87,198.587 199.588,198.87 cw(c199.658,198.94) 199.588,199.01 199.728,199.15 cw(c199.798,199.08) 199.868,199.15 200.081,198.938 ccw(c200.151,199.008) 200.221,198.938 200.349,199.066 201.613,200.329 201.613,210.277 201.612,210.91 202.499,211.798 202.499,213.167 202.779,213.447 202.779,215.048 203.429,215.697 203.738,215.697 v15(204.384,215.052)
DDR4_A3: R37.1 U1.AJ30 U8.N4 U9.N4 U10.N4 U11.N4 | length 89.5
  L1 w0.116: U9.N4@167.206,213.048 167.602,213.445 v2(167.605,213.445) ; U11.N4@178.666,213.048 179.063,213.445 v2(179.065,213.445) ; U1.AJ30@189.927,192.927 v6(190.414,193.414) ; U10.N4@190.127,213.048 190.523,213.445 v2(190.526,213.445) ; U8.N4@201.587,213.048 201.984,213.445 v2(201.986,213.445)
  L12 (Sign) w0.092: 165.894,213.445 166.215,213.124 167.113,213.124 v2@167.426,213.436 ; v2(167.605,213.445) v2@167.426,213.436 ; v2@179.063,213.445 178.719,213.445 178.361,213.086 167.866,213.086 167.516,213.436 v2@167.426,213.436 ; v2(179.065,213.445) 180.09,213.445 180.48,213.055 183.553,213.055 184.34,213.843 188.112,213.843 188.831,213.124 190.034,213.124 190.347,213.436 190.436,213.436 190.787,213.086 193.357,213.086 193.841,213.086 cw(c193.841,212.997) 193.93,212.997 ; 193.93,212.996 ccw(c194.02,212.996) 194.02,212.906 194.289,212.906 ccw(c194.289,212.996) 194.378,212.996 ; 194.378,212.997 cw(c194.468,212.997) 194.468,213.086 194.602,213.086 194.653,213.086 194.989,212.75 195.123,212.75 ccw(c195.123,212.84) 195.212,212.84 195.212,212.913 cw(c195.302,212.913) 195.302,213.003 195.571,213.003 cw(c195.571,212.913) 195.66,212.913 195.66,212.75 195.66,212.576 ccw(c195.75,212.576) 195.75,212.487 196.019,212.487 ccw(c196.019,212.576) 196.108,212.576 196.108,212.75 196.108,212.913 cw(c196.198,212.913) 196.198,213.003 196.466,213.003 cw(c196.466,212.913) 196.556,212.913 196.556,212.75 196.556,212.576 ccw(c196.645,212.576) 196.645,212.487 196.914,212.487 ccw(c196.914,212.576) 197.004,212.576 197.004,212.661 cw(c197.093,212.661) 197.093,212.75 199.489,212.75 200.642,212.75 200.977,213.086 201.628,213.086 v2(201.986,213.445)
  L3 (Sign) w0.092: v6(190.414,193.414) 190.414,193.176 190.859,192.732 191.256,192.732 192.141,193.616 192.351,193.826 ccw(c192.281,193.897) 192.351,193.967 191.576,194.742 cw(c191.646,194.812) 191.576,194.882 191.716,195.023 cw(c191.787,194.952) 191.857,195.023 192.632,194.248 ccw(c192.702,194.318) 192.772,194.248 192.913,194.388 ccw(c192.842,194.458) 192.913,194.528 192.138,195.303 cw(c192.208,195.373) 192.138,195.444 192.278,195.584 cw(c192.348,195.514) 192.418,195.584 193.193,194.809 ccw(c193.263,194.879) 193.334,194.809 193.474,194.949 ccw(c193.404,195.02) 193.474,195.09 192.699,195.865 cw(c192.769,195.935) 192.699,196.005 192.839,196.145 cw(c192.91,196.075) 192.98,196.145 193.755,195.37 ccw(c193.825,195.441) 193.895,195.37 194.035,195.511 ccw(c193.965,195.581) 194.035,195.651 193.26,196.426 cw(c193.331,196.496) 193.26,196.566 193.401,196.707 cw(c193.471,196.637) 193.541,196.707 194.316,195.932 ccw(c194.386,196.002) 194.457,195.932 194.597,196.072 ccw(c194.527,196.142) 194.597,196.213 193.822,196.988 cw(c193.892,197.058) 193.822,197.128 193.962,197.268 cw(c194.032,197.198) 194.103,197.268 194.878,196.493 ccw(c194.948,196.563) 195.018,196.493 195.158,196.634 ccw(c195.088,196.704) 195.158,196.774 194.383,197.549 cw(c194.454,197.619) 194.383,197.689 194.524,197.83 cw(c194.594,197.76) 194.664,197.83 195.439,197.055 ccw(c195.509,197.125) 195.579,197.055 195.72,197.195 ccw(c195.65,197.265) 195.72,197.335 194.945,198.11 cw(c195.015,198.181) 194.945,198.251 195.085,198.391 cw(c195.155,198.321) 195.226,198.391 196,197.616 ccw(c196.071,197.686) 196.141,197.616 196.281,197.757 ccw(c196.211,197.827) 196.281,197.897 195.506,198.672 cw(c195.576,198.742) 195.506,198.812 195.647,198.953 cw(c195.717,198.882) 195.787,198.953 196.562,198.178 ccw(c196.632,198.248) 196.702,198.178 196.913,198.388 197.053,198.529 197.104,198.579 197.104,209.558 200.56,213.014 201.556,213.014 v2(201.986,213.445)
DDR4_A4: R39.1 U1.AK28 U8.N3 U9.N3 U10.N3 U11.N3 | length 88
  L1 w0.116: v2(170.002,213.452) U9.N3@170.406,213.048 ; v1(181.463,213.452) U11.N3@181.866,213.048 ; U1.AK28@190.927,190.927 v6(191.616,190.927) ; v2(192.923,213.452) U10.N3@193.327,213.048 ; v15(204.384,213.452) U8.N3@204.787,213.048
  L5 (Sign) w0.092: v2(170.002,213.452) 170.533,213.452 170.975,213.893 179.967,213.893 180.409,213.452 v1(181.463,213.452) 182.243,213.452 182.639,213.848 191.473,213.848 191.869,213.452 v2(192.923,213.452) 193.454,213.452 193.896,213.893 194.094,213.893 195.857,213.893 cw(c195.857,213.804) 195.947,213.804 195.947,213.735 ccw(c196.036,213.735) 196.036,213.646 196.305,213.646 ccw(c196.305,213.735) 196.394,213.735 196.394,213.893 196.394,214.208 cw(c196.484,214.208) 196.484,214.298 196.753,214.298 cw(c196.753,214.208) 196.842,214.208 196.842,213.983 ccw(c196.932,213.983) 196.932,213.893 197.2,213.893 ccw(c197.2,213.983) 197.29,213.983 197.29,214.208 cw(c197.38,214.208) 197.38,214.298 197.648,214.298 cw(c197.648,214.208) 197.738,214.208 197.738,213.983 ccw(c197.827,213.983) 197.827,213.893 198.096,213.893 ccw(c198.096,213.983) 198.186,213.983 198.186,214.208 cw(c198.275,214.208) 198.275,214.298 198.544,214.298 cw(c198.544,214.208) 198.633,214.208 198.633,213.983 ccw(c198.723,213.983) 198.723,213.893 198.992,213.893 ccw(c198.992,213.983) 199.081,213.983 199.081,214.208 cw(c199.171,214.208) 199.171,214.298 199.439,214.298 cw(c199.439,214.208) 199.529,214.208 199.529,213.983 ccw(c199.619,213.983) 199.619,213.893 199.977,213.893 200.335,213.893 cw(c200.335,213.804) 200.425,213.804 200.425,213.735 ccw(c200.514,213.735) 200.514,213.646 200.783,213.646 ccw(c200.783,213.735) 200.872,213.735 200.872,213.804 cw(c200.962,213.804) 200.962,213.893 201.231,213.893 cw(c201.231,213.804) 201.32,213.804 201.32,213.791 ccw(c201.41,213.791) 201.41,213.701 201.678,213.701 ccw(c201.678,213.791) 201.768,213.791 201.768,213.893 201.768,214.208 cw(c201.858,214.208) 201.858,214.298 202.126,214.298 cw(c202.126,214.208) 202.216,214.208 202.216,213.893 202.216,213.705 ccw(c202.305,213.705) 202.305,213.615 202.574,213.615 ccw(c202.574,213.705) 202.664,213.705 202.664,213.804 cw(c202.753,213.804) 202.753,213.893 202.888,213.893 203.329,213.452 v15(204.384,213.452)
  L3 (Sign) w0.092: v6(191.616,190.927) 191.847,190.927 191.946,190.927 ccw(c191.946,191.026) 192.046,191.026 cw(c192.145,191.026) 192.145,191.126 192.343,191.126 cw(c192.343,191.026) 192.443,191.026 192.443,190.927 192.443,190.787 ccw(c192.542,190.787) 192.542,190.688 192.74,190.688 ccw(c192.74,190.787) 192.84,190.787 192.84,190.828 cw(c192.939,190.828) 192.939,190.927 193.073,190.927 193.214,191.067 ; 193.213,191.068 cw(c193.283,191.138) 193.213,191.208 193.354,191.349 cw(c193.424,191.278) 193.494,191.349 ; 193.494,191.348 193.996,190.847 ccw(c194.066,190.917) 194.136,190.847 194.276,190.987 ccw(c194.206,191.057) 194.276,191.128 193.775,191.629 cw(c193.843,191.696) 193.775,191.764 193.921,191.91 cw(c193.988,191.842) 194.056,191.91 194.557,191.408 ccw(c194.627,191.478) 194.697,191.408 194.838,191.549 ccw(c194.768,191.619) 194.838,191.689 194.337,192.19 cw(c194.404,192.258) 194.337,192.325 194.482,192.471 cw(c194.55,192.404) 194.617,192.471 195.119,191.97 ccw(c195.189,192.04) 195.259,191.97 195.399,192.11 ccw(c195.329,192.18) 195.399,192.25 194.898,192.752 cw(c194.965,192.819) 194.898,192.887 195.044,193.032 cw(c195.111,192.965) 195.179,193.032 195.68,192.531 ccw(c195.75,192.601) 195.82,192.531 195.961,192.672 ccw(c195.891,192.742) 195.961,192.812 195.459,193.313 cw(c195.527,193.381) 195.459,193.448 195.605,193.594 cw(c195.673,193.526) 195.74,193.594 196.241,193.093 ccw(c196.312,193.163) 196.382,193.093 196.522,193.233 ccw(c196.452,193.303) 196.522,193.373 196.021,193.875 cw(c196.088,193.942) 196.021,194.01 196.167,194.155 cw(c196.234,194.088) 196.302,194.155 196.379,194.078 ccw(c196.449,194.149) 196.519,194.078 196.659,194.219 ccw(c196.589,194.289) 196.659,194.359 196.582,194.436 cw(c196.65,194.503) 196.582,194.571 196.728,194.717 cw(c196.796,194.649) 196.863,194.717 196.94,194.64 ccw(c197.01,194.71) 197.08,194.64 197.221,194.78 ccw(c197.151,194.85) 197.221,194.921 197.144,194.997 cw(c197.211,195.065) 197.144,195.132 197.29,195.278 cw(c197.357,195.211) 197.424,195.278 197.501,195.201 ccw(c197.572,195.271) 197.642,195.201 197.782,195.342 ccw(c197.712,195.412) 197.782,195.482 197.705,195.559 cw(c197.773,195.626) 197.705,195.694 197.851,195.84 cw(c197.918,195.772) 197.986,195.84 198.063,195.763 ccw(c198.133,195.833) 198.203,195.763 198.344,195.903 ccw(c198.273,195.973) 198.344,196.043 198.267,196.12 cw(c198.334,196.188) 198.267,196.255 198.412,196.401 cw(c198.48,196.334) 198.547,196.401 198.624,196.324 ccw(c198.694,196.394) 198.765,196.324 198.905,196.465 ccw(c198.835,196.535) 198.905,196.605 198.828,196.682 cw(c198.896,196.749) 198.828,196.817 198.974,196.963 cw(c199.041,196.895) 199.109,196.963 199.186,196.886 ccw(c199.256,196.956) 199.326,196.886 199.466,197.026 ccw(c199.396,197.096) 199.466,197.166 199.39,197.243 cw(c199.457,197.311) 199.39,197.378 199.535,197.524 cw(c199.603,197.457) 199.67,197.524 199.884,197.31 ccw(c199.954,197.38) 200.024,197.31 200.165,197.451 ccw(c200.095,197.521) 200.165,197.591 199.951,197.805 cw(c200.018,197.872) 199.951,197.94 200.097,198.085 cw(c200.164,198.018) 200.232,198.085 200.397,197.92 ccw(c200.468,197.99) 200.538,197.92 200.678,198.06 ccw(c200.608,198.13) 200.678,198.2 200.512,198.366 cw(c200.58,198.434) 200.512,198.501 200.658,198.647 cw(c200.726,198.579) 200.793,198.647 200.959,198.481 ccw(c201.029,198.551) 201.099,198.481 201.24,198.621 ccw(c201.169,198.692) 201.24,198.762 201.074,198.928 cw(c201.141,198.995) 201.074,199.062 201.22,199.208 cw(c201.287,199.141) 201.355,199.208 201.52,199.043 ccw(c201.591,199.113) 201.661,199.043 201.801,199.183 ccw(c201.731,199.253) 201.801,199.323 201.635,199.489 cw(c201.703,199.556) 201.635,199.624 201.781,199.77 cw(c201.849,199.702) 201.916,199.77 202.082,199.604 ccw(c202.152,199.674) 202.222,199.604 202.362,199.744 ccw(c202.292,199.815) 202.362,199.885 202.267,199.98 cw(c202.337,200.05) 202.267,200.121 202.457,200.311 202.964,200.818 202.964,211.363 203.237,211.635 203.237,213.536 203.517,213.817 204.172,213.817 204.384,213.606 v15(204.384,213.452)